# Altium PCB NB3000XN.PcbDoc (part 70 of 71)
Units mil, origin at the board's own origin, x right, y up, seen from the top; angles counter-clockwise.
Board outline 9527.56 x 6929.77 mil, 6 copper layers (Top Layer, GND+SHIELD, MidLayer1, MidLayer2, P2 - 3V3+5V0, Bottom Layer), stack 62.375 mil thick; 832 components, 1027 nets, 4655 pads, 4981 vias.
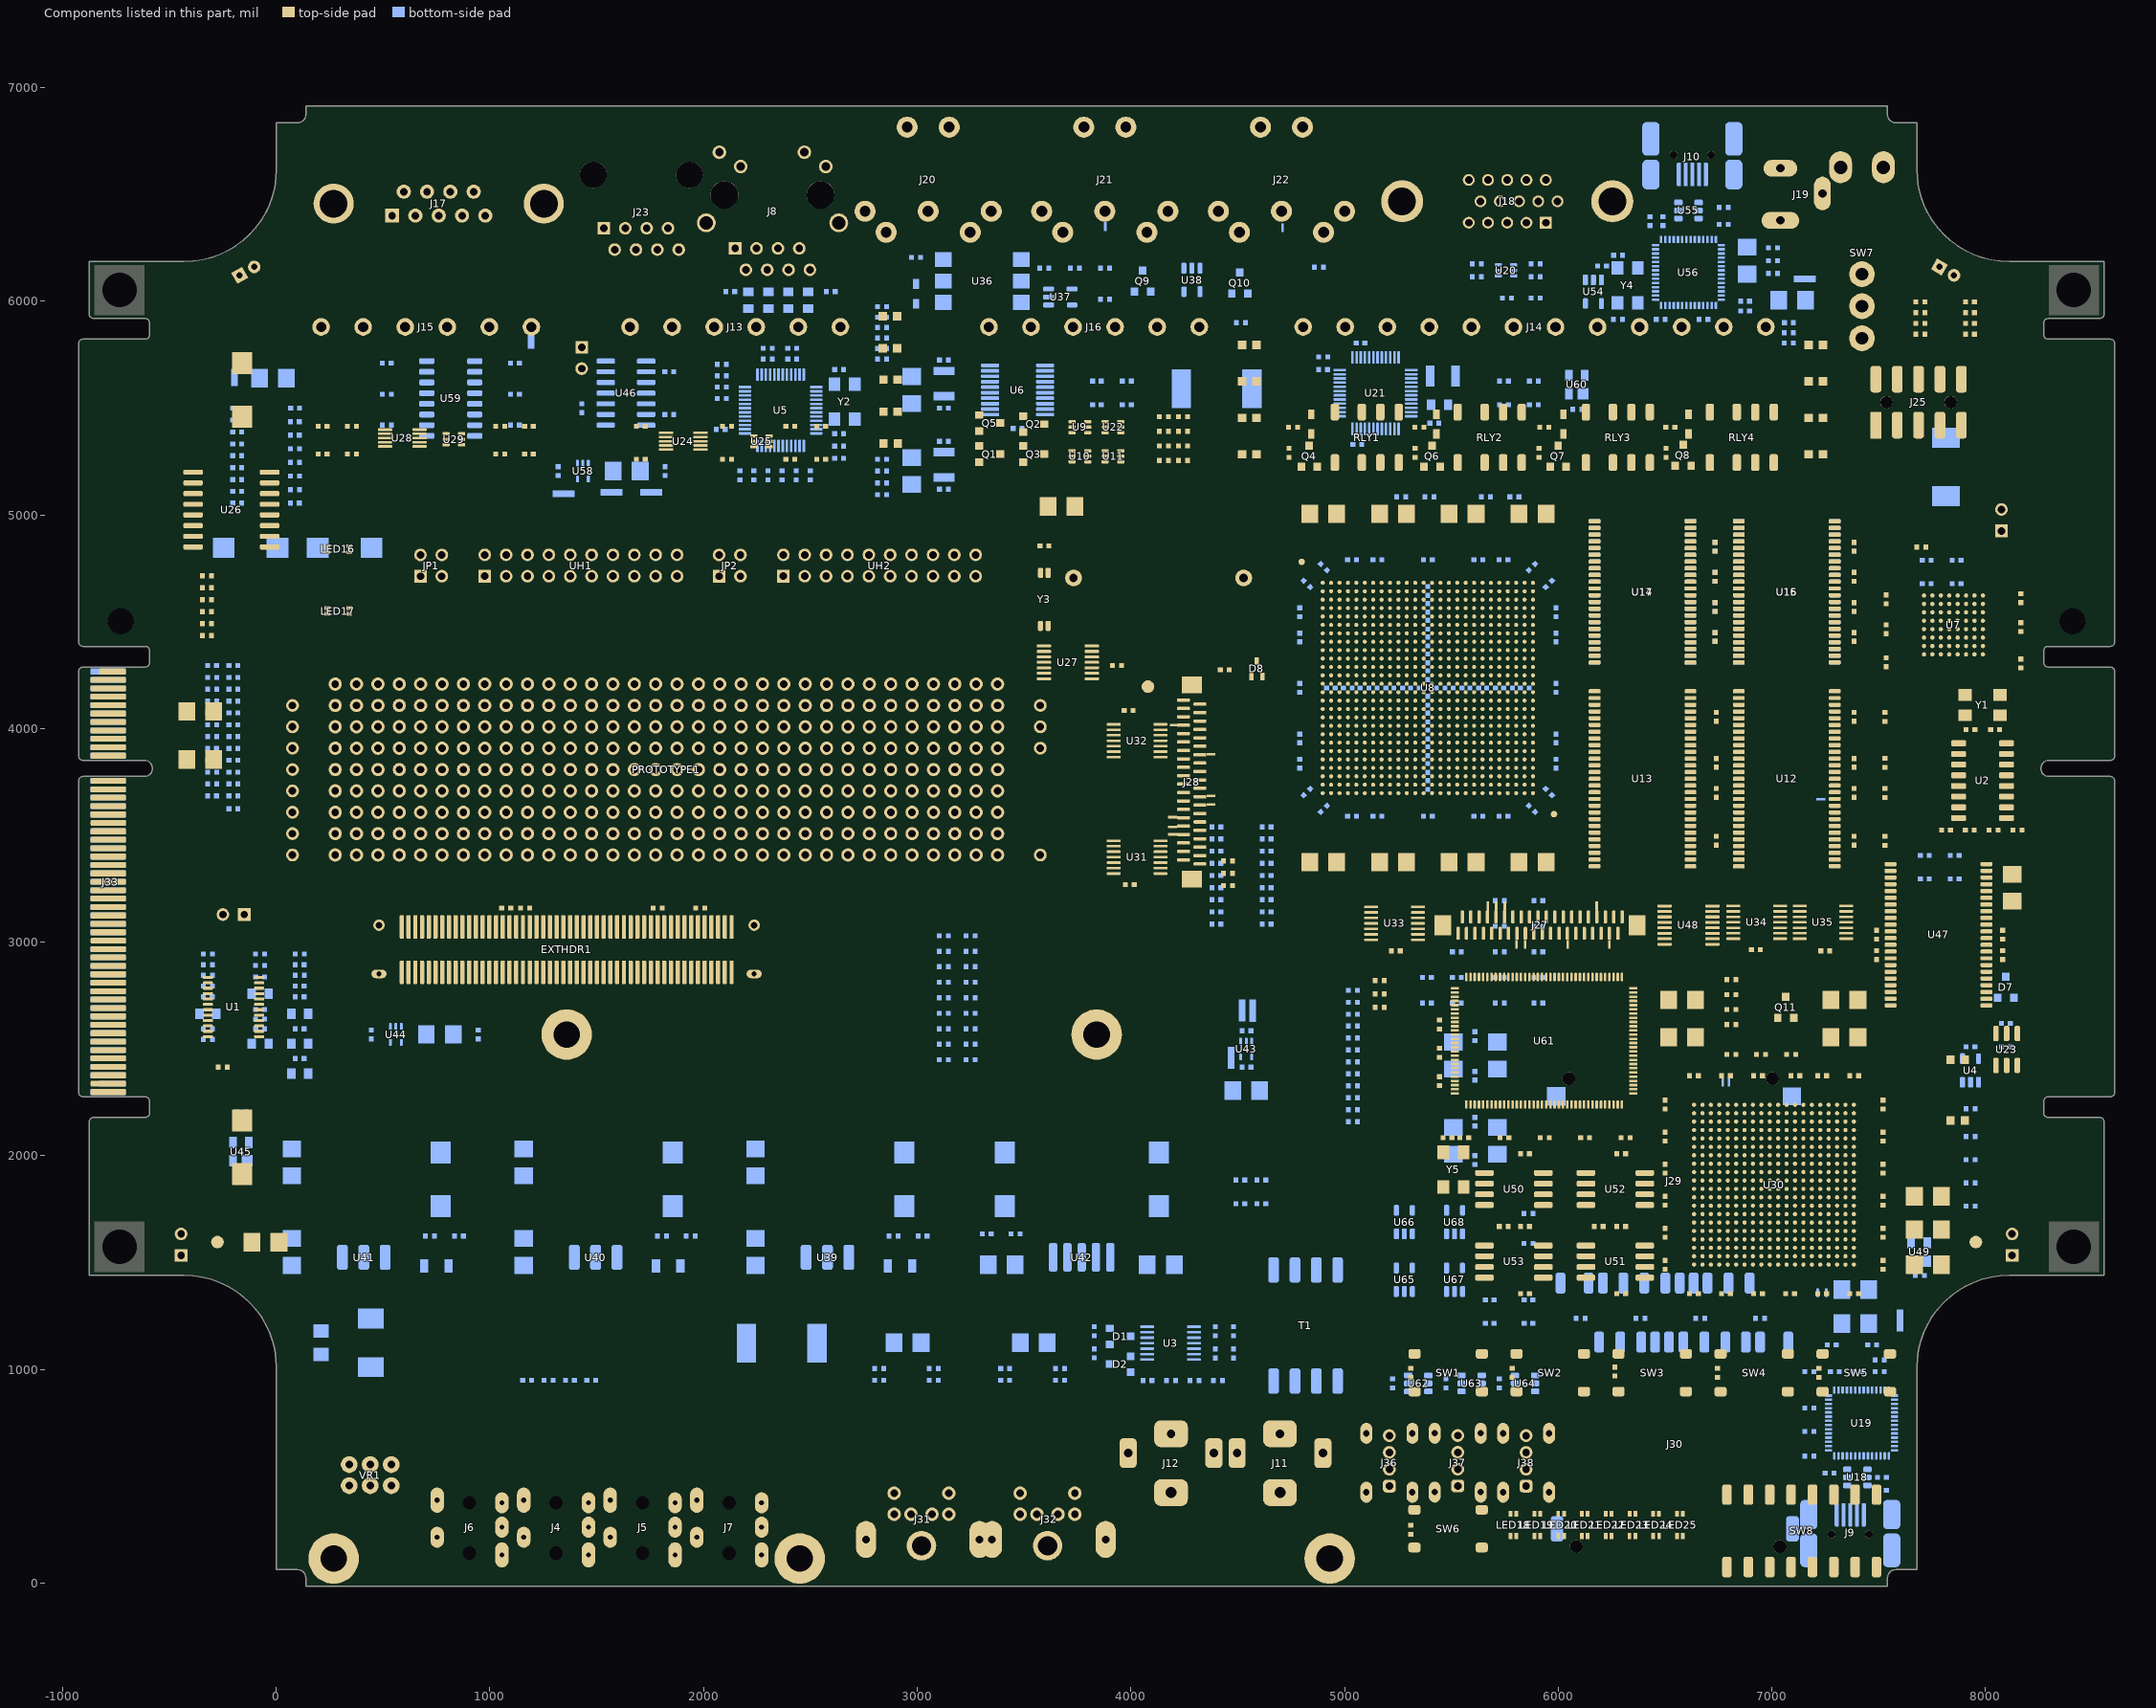
[diagram p74: the components of this part, seen from the top]

## Keep-outs
Keep-Out Layer:
  lines w15: -923.8,2295.89 -923.31,2291.51 -921.85,2287.35 -919.5,2283.62 -916.39,2280.5 -912.66,2278.15 -908.49,2276.7 -904.11,2276.2 -612.78,2276.2 -608.4,2275.71 -604.24,2274.25 -600.5,2271.91 -597.39,2268.79 -595.04,2265.06 -593.59,2260.9 -593.09,2256.52 -593.09,2199.42 -593.59,2195.04 -595.04,2190.88 -597.39,2187.15 -600.5,2184.03 -604.24,2181.68 -608.4,2180.23 -612.78,2179.74 -854.9,2179.74 -859.28,2179.24 -863.44,2177.79 -867.17,2175.44 -870.29,2172.32 -872.64,2168.59 -874.09,2164.43 -874.59,2160.05 -874.59,1441.32 -431.67,1441.32 -389.22,1439.23 -347.19,1433 -305.96,1422.67 -265.94,1408.35 -227.52,1390.18 -191.07,1368.33 -156.94,1343.01 -125.45,1314.46 -96.9,1282.97 -71.59,1248.83 -49.74,1212.37 -31.57,1173.95 -17.25,1133.93 -6.92,1092.7 -0.69,1050.65 1.4,1008.2 1.4,63.2 99.82,63.2 108.58,62.22 116.9,59.3 124.37,54.61 130.6,48.38 135.29,40.91 138.21,32.59 139.19,23.83 139.19,-15.55 7540.77,-15.55 7540.77,23.83 7541.76,32.59 7544.67,40.91 7549.36,48.38 7555.59,54.61 7563.06,59.31 7571.38,62.22 7580.14,63.2 7678.56,63.2 7678.56,1008.2 7680.65,1050.65 7686.89,1092.7 7697.21,1133.93 7711.53,1173.95 7729.7,1212.37 7751.55,1248.83 7776.87,1282.97 7805.41,1314.46 7836.9,1343.01 7871.03,1368.33 7907.49,1390.18 7945.91,1408.35 7985.92,1422.67 8027.15,1433 8069.19,1439.23 8111.63,1441.32 8554.55,1441.32 8554.55,2160.05 8554.05,2164.43 8552.6,2168.59 8550.25,2172.32 8547.13,2175.44 8543.4,2177.79 8539.24,2179.24 8534.86,2179.74 8292.74,2179.74 8288.36,2180.23 8284.2,2181.68 8280.47,2184.03 8277.35,2187.15 8275,2190.88 8273.55,2195.04 8273.05,2199.42 8273.05,2256.52 8273.55,2260.9 8275,2265.06 8277.35,2268.79 8280.47,2271.91 8284.2,2274.25 8288.36,2275.71 8292.74,2276.2 8584.08,2276.2 8588.46,2276.7 8592.62,2278.15 8596.35,2280.5 8599.46,2283.62 8601.81,2287.35 8603.27,2291.51 8603.76,2295.89 8603.76,3756.1 8603.27,3760.48 8601.81,3764.64 8599.46,3768.38 8596.35,3771.5 8592.62,3773.84 8588.46,3775.3 8584.08,3775.79 8296.67,3775.79 8288.9,3776.61 8281.46,3779.03 8274.69,3782.93 8268.88,3788.17 8264.28,3794.49 8261.1,3801.64 8259.48,3809.29 8259.48,3817.11 8261.1,3824.76 8264.28,3831.9 8268.88,3838.23 8274.69,3843.46 8281.46,3847.37 8288.9,3849.79 8296.67,3850.6 8584.08,3850.6 8588.46,3851.1 8592.62,3852.55 8596.35,3854.9 8599.46,3858.02 8601.81,3861.75 8603.27,3865.91 8603.76,3870.29 8603.76,4268.57 8603.27,4272.95 8601.81,4277.11 8599.46,4280.84 8596.35,4283.96 8592.62,4286.3 8588.46,4287.76 8584.08,4288.25 8292.74,4288.25 8288.36,4288.75 8284.2,4290.2 8280.47,4292.55 8277.35,4295.67 8275,4299.4 8273.55,4303.56 8273.05,4307.94 8273.05,4365.03 8273.55,4369.41 8275,4373.58 8277.35,4377.31 8280.47,4380.43 8284.2,4382.77 8288.36,4384.23 8292.74,4384.72 8584.08,4384.72 8588.46,4385.21 8592.62,4386.67 8596.35,4389.02 8599.46,4392.13 8601.81,4395.87 8603.27,4400.03 8603.76,4404.41 8603.76,5803 8603.27,5807.38 8601.81,5811.54 8599.46,5815.28 8596.35,5818.39 8592.62,5820.74 8588.46,5822.19 8584.08,5822.69 8292.74,5822.69 8288.36,5823.18 8284.2,5824.64 8280.47,5826.98 8277.35,5830.1 8275,5833.83 8273.55,5837.99 8273.05,5842.37 8273.05,5899.47 8273.55,5903.85 8275,5908.01 8277.35,5911.74 8280.47,5914.86 8284.2,5917.2 8288.36,5918.66 8292.74,5919.16 8534.86,5919.16 8539.24,5919.65 8543.4,5921.1 8547.13,5923.45 8550.25,5926.57 8552.6,5930.3 8554.05,5934.46 8554.55,5938.84 8554.55,6185.98 8110.73,6185.98 8068.37,6188.06 8026.42,6194.28 7985.28,6204.59 7945.35,6218.88 7907.01,6237.01 7870.63,6258.82 7836.57,6284.09 7805.14,6312.57 7776.66,6344 7751.4,6378.07 7729.59,6414.45 7711.46,6452.79 7697.17,6492.73 7686.87,6533.88 7680.65,6575.83 7678.56,6618.2 7678.56,6835.48 7580.14,6835.48 7571.38,6836.46 7563.05,6839.37 7555.59,6844.07 7549.36,6850.3 7544.67,6857.77 7541.76,6866.09 7540.77,6874.85 7540.77,6914.22 139.19,6914.22 139.19,6874.85 138.21,6866.09 135.29,6857.76 130.6,6850.3 124.37,6844.06 116.9,6839.37 108.58,6836.46 99.82,6835.47 1.4,6835.47 1.4,6618.2 -0.68,6575.83 -6.91,6533.87 -17.21,6492.73 -31.5,6452.79 -49.63,6414.45 -71.43,6378.07 -96.7,6344 -125.18,6312.57 -156.61,6284.09 -190.67,6258.82 -227.05,6237.01 -265.39,6218.88 -305.32,6204.59 -346.46,6194.28 -388.41,6188.06 -430.77,6185.98 -874.59,6185.98 -874.59,5938.84 -874.09,5934.46 -872.64,5930.3 -870.29,5926.57 -867.17,5923.45 -863.44,5921.1 -859.28,5919.65 -854.9,5919.15 -612.78,5919.15 -608.4,5918.66 -604.24,5917.2 -600.5,5914.86 -597.39,5911.74 -595.04,5908.01 -593.59,5903.85 -593.09,5899.47 -593.09,5842.37 -593.59,5837.99 -595.04,5833.83 -597.39,5830.1 -600.5,5826.98 -604.24,5824.64 -608.4,5823.18 -612.78,5822.69 -904.11,5822.69 -908.49,5822.19 -912.66,5820.74 -916.39,5818.39 -919.5,5815.27 -921.85,5811.54 -923.31,5807.38 -923.8,5803 -923.8,4404.41 -923.31,4400.03 -921.85,4395.87 -919.5,4392.13 -916.39,4389.02 -912.66,4386.67 -908.49,4385.21 -904.11,4384.72 -612.78,4384.72 -608.4,4384.23 -604.24,4382.77 -600.5,4380.43 -597.39,4377.31 -595.04,4373.58 -593.59,4369.41 -593.09,4365.03 -593.09,4307.94 -593.59,4303.56 -595.04,4299.4 -597.39,4295.67 -600.5,4292.55 -604.24,4290.2 -608.4,4288.75 -612.78,4288.25 -904.11,4288.25 -908.49,4287.76 -912.66,4286.3 -916.39,4283.96 -919.5,4280.84 -921.85,4277.11 -923.31,4272.95 -923.8,4268.56 -923.8,3870.29 -923.31,3865.91 -921.85,3861.75 -919.5,3858.01 -916.39,3854.9 -912.66,3852.55 -908.49,3851.1 -904.11,3850.6 -616.71,3850.6 -608.94,3849.79 -601.5,3847.37 -594.73,3843.46 -588.92,3838.23 -584.32,3831.9 -581.14,3824.76 -579.52,3817.11 -579.52,3809.29 -581.14,3801.64 -584.32,3794.49 -588.92,3788.17 -594.73,3782.93 -601.5,3779.02 -608.94,3776.61 -616.71,3775.79 -904.11,3775.79 -908.49,3775.3 -912.66,3773.84 -916.39,3771.49 -919.5,3768.38 -921.85,3764.64 -923.31,3760.48 -923.8,3756.1 -923.8,2295.89 ; -530.1,1864.15 -530.1,2218.52 -529.11,2227.28 -526.2,2235.6 -521.51,2243.07 -515.27,2249.3 -507.81,2253.99 -499.49,2256.91 -490.73,2257.89 -392.3,2257.89 -383.54,2256.91 -375.22,2253.99 -367.76,2249.3 -361.52,2243.07 -356.83,2235.6 -353.92,2227.28 -352.93,2218.52 -352.93,1864.15 -353.92,1855.38 -356.83,1847.06 -361.52,1839.6 -367.76,1833.36 -375.22,1828.67 -383.54,1825.76 -392.3,1824.77 -490.73,1824.77 -499.49,1825.76 -507.81,1828.67 -515.27,1833.36 -521.51,1839.6 -526.2,1847.06 -529.11,1855.38 -530.1,1864.15 ; -530.1,5407.88 -529.11,5399.11 -526.2,5390.79 -521.51,5383.32 -515.27,5377.09 -507.81,5372.4 -499.49,5369.49 -490.73,5368.5 -392.3,5368.5 -383.54,5369.49 -375.22,5372.4 -367.76,5377.09 -361.52,5383.32 -356.83,5390.79 -353.92,5399.11 -352.93,5407.88 -352.93,5762.25 -353.92,5771.01 -356.83,5779.33 -361.52,5786.8 -367.76,5793.03 -375.22,5797.72 -383.54,5800.64 -392.3,5801.62 -490.73,5801.62 -499.49,5800.64 -507.81,5797.72 -515.27,5793.03 -521.51,5786.8 -526.2,5779.33 -529.11,5771.01 -530.1,5762.25 -530.1,5407.88 ; 3623.45,3616.32 3624.43,3607.56 3627.34,3599.24 3632.03,3591.77 3638.27,3585.54 3645.73,3580.85 3654.05,3577.94 3662.81,3576.95 4017.15,3576.95 4025.91,3577.94 4034.23,3580.85 4041.69,3585.54 4047.93,3591.77 4052.62,3599.24 4055.53,3607.56 4056.52,3616.32 4056.52,3714.76 4055.53,3723.52 4052.62,3731.84 4047.93,3739.31 4041.69,3745.54 4034.23,3750.24 4025.91,3753.15 4017.15,3754.13 3662.81,3754.13 3654.05,3753.15 3645.73,3750.24 3638.27,3745.54 3632.03,3739.31 3627.34,3731.84 3624.43,3723.52 3623.45,3714.76 3623.45,3616.32 ; 4505.53,3715.21 4506.03,3710.83 4507.48,3706.67 4509.83,3702.94 4512.95,3699.82 4516.68,3697.47 4520.84,3696.02 4525.22,3695.52 4631.52,3695.52 4635.9,3696.02 4640.06,3697.47 4643.79,3699.82 4646.91,3702.94 4649.25,3706.67 4650.71,3710.83 4651.21,3715.21 4651.21,3912.08 4650.71,3916.47 4649.25,3920.63 4646.91,3924.36 4643.79,3927.48 4640.06,3929.82 4635.9,3931.28 4631.52,3931.77 4525.22,3931.77 4520.84,3931.28 4516.68,3929.82 4512.95,3927.48 4509.83,3924.36 4507.48,3920.63 4506.03,3916.47 4505.53,3912.08 4505.53,3715.21 ; 5224.07,2182.81 5224.57,2178.43 5226.02,2174.27 5228.37,2170.54 5231.48,2167.42 5235.21,2165.08 5239.37,2163.62 5243.76,2163.13 5350.06,2163.13 5354.43,2163.62 5358.6,2165.08 5362.33,2167.42 5365.45,2170.54 5367.79,2174.27 5369.25,2178.43 5369.74,2182.81 5369.74,2379.69 5369.25,2384.07 5367.79,2388.23 5365.45,2391.96 5362.33,2395.08 5358.6,2397.42 5354.43,2398.88 5350.06,2399.37 5243.76,2399.37 5239.37,2398.88 5235.21,2397.42 5231.48,2395.08 5228.37,2391.96 5226.02,2388.23 5224.57,2384.07 5224.07,2379.69 5224.07,2182.81 ; 7581.87,2182.81 7582.37,2178.43 7583.83,2174.27 7586.17,2170.54 7589.29,2167.42 7593.02,2165.08 7597.18,2163.62 7601.56,2163.13 7707.86,2163.13 7712.24,2163.62 7716.4,2165.08 7720.13,2167.42 7723.25,2170.54 7725.6,2174.27 7727.05,2178.43 7727.54,2182.81 7727.54,2379.69 7727.05,2384.07 7725.6,2388.23 7723.25,2391.96 7720.13,2395.08 7716.4,2397.42 7712.24,2398.88 7707.86,2399.37 7601.56,2399.37 7597.18,2398.88 7593.02,2397.42 7589.29,2395.08 7586.17,2391.96 7583.83,2388.23 7582.37,2384.07 7581.87,2379.69 7581.87,2182.81 ; 7603.95,3715.21 7604.45,3710.83 7605.9,3706.67 7608.25,3702.94 7611.37,3699.82 7615.1,3697.47 7619.26,3696.02 7623.64,3695.52 7729.94,3695.52 7734.32,3696.02 7738.48,3697.47 7742.21,3699.82 7745.33,3702.94 7747.67,3706.67 7749.13,3710.83 7749.62,3715.21 7749.62,3912.08 7749.13,3916.47 7747.67,3920.63 7745.33,3924.36 7742.21,3927.48 7738.48,3929.82 7734.32,3931.28 7729.94,3931.77 7623.64,3931.77 7619.26,3931.28 7615.1,3929.82 7611.37,3927.48 7608.25,3924.36 7605.9,3920.63 7604.45,3916.47 7603.95,3912.08 7603.95,3715.21 ; 8032.89,1864.15 8033.88,1855.39 8036.79,1847.06 8041.48,1839.6 8047.72,1833.36 8055.18,1828.67 8063.5,1825.76 8072.26,1824.77 8170.69,1824.77 8179.45,1825.76 8187.77,1828.67 8195.24,1833.36 8201.47,1839.6 8206.16,1847.06 8209.07,1855.39 8210.06,1864.15 8210.06,2218.52 8209.07,2227.28 8206.16,2235.6 8201.47,2243.07 8195.24,2249.3 8187.77,2254 8179.45,2256.91 8170.69,2257.89 8072.26,2257.89 8063.5,2256.91 8055.18,2254 8047.72,2249.3 8041.48,2243.07 8036.79,2235.6 8033.88,2227.28 8032.89,2218.52 8032.89,1864.15 ; 8032.89,5407.88 8033.88,5399.11 8036.79,5390.79 8041.48,5383.32 8047.72,5377.09 8055.18,5372.4 8063.5,5369.49 8072.26,5368.5 8170.69,5368.5 8179.45,5369.49 8187.77,5372.4 8195.24,5377.09 8201.47,5383.32 8206.16,5390.79 8209.07,5399.11 8210.06,5407.88 8210.06,5762.25 8209.07,5771.01 8206.16,5779.33 8201.47,5786.8 8195.24,5793.03 8187.77,5797.72 8179.45,5800.64 8170.69,5801.62 8072.26,5801.62 8063.5,5800.64 8055.18,5797.72 8047.72,5793.03 8041.48,5786.8 8036.79,5779.33 8033.88,5771.01 8032.89,5762.25 8032.89,5407.88

## Other copper
Top Layer:
  rectangle net GND: 3455,5210 3535,5285
  region net 2V5: 4114.02,1421.93 4114.02,1456.93 4039.02,1456.93 4039.02,1421.93
  region net 2V5: 4114.02,1525.79 4114.02,1560.79 4039.02,1560.79 4039.02,1525.79
  region net 2V5: 4167.01,1686.77 4167.01,1721.77 4092.01,1721.77 4092.01,1686.77
  region net 2V5: 4167.01,1808.82 4167.01,1843.82 4092.01,1843.82 4092.01,1808.82
  rectangle net GND: 3455,5350 3535,5439
  rectangle net GND: 3250,5355 3330,5430
  rectangle net GND: 3250,5210 3330,5285
  rectangle net GND: 115,4495 185,4525
  rectangle net 5V0: 5,1450 40,1525
  rectangle net 5V0: 108.86,1450 143.86,1525
  rectangle net GND: 108.86,1575.98 143.86,1650.98
  rectangle net 5V0: 258.86,1475 293.86,1585
  rectangle net 3V3: 428.86,1475 463.86,1670
  rectangle net 3V3: 454.85,1590 485,1670
  rectangle net GND: 5,1995 145,2070
  rectangle net 3V3: 5,1869.02 145,1944.02
  rectangle net 2V5: 1090,1868.03 1230,1943.03
  rectangle net GND: 1090,1994.02 1230,2069.02
  rectangle net 1V8: 2175,1868.03 2315,1943.03
  rectangle net GND: 2175,1994.02 2315,2069.02
  rectangle net 2V5: 1539.85,1590 1570,1670
  rectangle net 2V5: 1513.86,1475 1548.86,1670
  rectangle net 5V0: 1343.86,1475 1378.86,1585
  rectangle net 1V8: 2624.85,1590 2655,1670
  rectangle net 1V8: 2598.86,1475 2633.86,1670
  rectangle net 3V3: 2428.86,1475 2463.86,1585
  rectangle net GND: 2175,1574.02 2315,1649.02
  rectangle net 3V3: 2175,1448.03 2315,1523.03
  rectangle net 5V0: 648.86,1447.5 683.86,1522.5
  rectangle net 5V0: 704.68,1447.5 739.68,1522.5
  rectangle net GND: 763.03,1447.5 798.03,1522.5
  rectangle net GND: 818.86,1447.5 853.86,1522.5
  rectangle net GND: 1090,1575.98 1125,1650.98
  rectangle net 5V0: 1090,1450 1125,1525
  rectangle net GND: 1193.86,1575.98 1228.86,1650.98
  rectangle net 5V0: 1193.86,1450 1228.86,1525
  region net GND: 807.01,2060.79 807.01,2095.79 732.01,2095.79 732.01,2060.79
  region net GND: 807.01,1938.74 807.01,1973.74 732.01,1973.74 732.01,1938.74
  region net 3V3: 807.01,1808.82 807.01,1843.82 732.01,1843.82 732.01,1808.82
  region net 3V3: 807.01,1686.77 807.01,1721.77 732.01,1721.77 732.01,1686.77
  region net GND: 1892.01,2060.79 1892.01,2095.79 1817.01,2095.79 1817.01,2060.79
  region net GND: 1892.01,1938.74 1892.01,1973.74 1817.01,1973.74 1817.01,1938.74
  region net 2V5: 1862.01,1808.82 1862.01,1843.82 1787.01,1843.82 1787.01,1808.82
  region net 2V5: 1862.01,1686.77 1862.01,1721.77 1787.01,1721.77 1787.01,1686.77
  rectangle net 5V0: 1733.86,1447.5 1768.86,1522.5
  rectangle net 5V0: 1789.68,1447.5 1824.68,1522.5
  rectangle net GND: 1848.03,1447.5 1883.03,1522.5
  rectangle net GND: 1903.86,1447.5 1938.86,1522.5
  region net GND: 2977.01,2060.79 2977.01,2095.79 2902.01,2095.79 2902.01,2060.79
  region net GND: 3017.44,2052.64 2982.44,2052.64 2982.44,1977.64 3017.44,1977.64
  region net 1V8: 2895.39,1800.67 2860.39,1800.67 2860.39,1725.67 2895.39,1725.67
  region net 1V8: 2962.01,1686.77 2962.01,1721.77 2887.01,1721.77 2887.01,1686.77
  rectangle net 3V3: 2818.86,1447.5 2853.86,1522.5
  rectangle net 3V3: 2874.68,1447.5 2909.68,1522.5
  rectangle net GND: 2933.03,1447.5 2968.03,1522.5
  rectangle net GND: 2988.86,1447.5 3023.86,1522.5
  region net GND: 3446.46,2060.79 3446.46,2095.79 3371.46,2095.79 3371.46,2060.79
  region net GND: 3446.46,1938.74 3446.46,1973.74 3371.46,1973.74 3371.46,1938.74
  region net 1V2: 3364.84,1810.67 3329.84,1810.67 3329.84,1735.67 3364.84,1735.67
  region net 1V2: 3486.89,1810.67 3451.89,1810.67 3451.89,1735.67 3486.89,1735.67
  region net GND: 3369.02,1525.79 3369.02,1560.79 3294.02,1560.79 3294.02,1525.79
  region net 1V2: 3495,1525.79 3495,1560.79 3420,1560.79 3420,1525.79
  region net GND: 3369.02,1421.93 3369.02,1456.93 3294.02,1456.93 3294.02,1421.93
  region net 1V2: 3495,1421.93 3495,1456.93 3420,1456.93 3420,1421.93
  region net 1V2: 3680,1421.86 3680,1456.86 3540,1456.86 3540,1421.86
  rectangle net GND: 3753.86,1391.01 3788.86,1466.01
  region net GND: 4240,1421.93 4240,1456.93 4165,1456.93 4165,1421.93
  region net GND: 4240,1523.86 4240,1558.86 4165,1558.86 4165,1523.86
  region net GND: 4167.01,1938.74 4167.01,1973.74 4092.01,1973.74 4092.01,1938.74
  region net GND: 4167.01,2060.79 4167.01,2095.79 4092.01,2095.79 4092.01,2060.79
  region net 3V3: 386,1670 331,1670 331,1590 386,1590
  region net 3V3: 387.14,1670 363,1670 363,1475 387.14,1475
  region net 5V0: 357,1585 331,1585 331,1475 357,1475
  region net 5V0: 1442,1585 1416,1585 1416,1475 1442,1475
  region net 2V5: 1472.14,1670 1448,1670 1448,1475 1472.14,1475
  region net 2V5: 1471,1670 1416,1670 1416,1590 1471,1590
  region net 3V3: 2527,1585 2501,1585 2501,1475 2527,1475
  region net 1V8: 2557.14,1670 2533,1670 2533,1475 2557.14,1475
  region net 1V8: 2556,1670 2500.99,1670 2500.99,1590 2556,1590
  region net GND: 110.08,1648.78 110.08,1683.78 35.08,1683.78 35.08,1648.78
  region net 5V0: 757,3132 757,3155 670,3155 670,3132
  region net 3V3: 820,3131.84 820,3154.84 764.65,3154.84 764.65,3131.84
  region net 2V5: 882.84,3132 882.84,3155 827.48,3155 827.48,3132
  region net 1V8: 945.83,3132 945.83,3155 890.47,3155 890.47,3132
  region net PWMPWR: 3346,5718.96 3346,5741.96 3232.65,5741.96 3232.65,5718.96
  region net 5V0: 4707,5718 4707,5741.96 4622.65,5741.96 4622.65,5718
  rectangle net 5V0: -687.6,2292.5 -648.1,2345.8
  rectangle net +B: 7750,5265 7880,5315
  rectangle net GND: 7749.51,5134.9 7879.51,5184.9
  region net 1V2: 1008.98,3131.84 1008.98,3154.84 953.62,3154.84 953.62,3131.84
  rectangle net AUGND: 1095,560 1125,630
  pour cut-out: 4878.19,4701.81 5901.81,4701.81 5901.81,3678.19 4878.19,3678.19
  pour cut-out: 6615.37,2260.05 7403.7,2258.7 7403.7,1471.3 6616.3,1471.3
  pour cut-out: 7691.59,4643.83 8007.48,4642.48 8007.48,4327.52 7692.52,4327.52
MidLayer1:
  rectangle net SHIELD: 5590,364.61 5790,774.61
  rectangle net SHIELD: 3540,-15.55 3680,245
  rectangle net SHIELD: 2950,-15.55 3090,245
  rectangle net SHIELD: 3830,-15.55 3935,300
  rectangle net SHIELD: 3235,-15.55 3410,300
  rectangle net SHIELD: 5270,365 5470,775
MidLayer2:
  rectangle net SHIELD: 7470,6625 7575,6914.22
  rectangle net SHIELD: 7270,6625 7375,6914.22
  rectangle net SHIELD: 6160,6460 6350,6920
  rectangle net SHIELD: 5175,6460 5365,6920
Bottom Layer:
  drawing of 98 lines, arcs and shapes, not listed
P2 - 3V3+5V0 (plane layer: these items are gaps in the copper):
  lines w10: 0.1,500.1 2432.5,500.1 cw(c2432.5,467.5) 2465.1,467.5 ; 849.4,1356.3 986.3,1356.3 ccw(c986.3,1435.04) 1065.04,1435.04 1065.04,1510 cw(c1143.78,1510) 1143.78,1588.74 1210,1588.74 ccw(c1210,1648.74) 1252.43,1606.31 1293.55,1647.44 cw(c1335.98,1605.01) 1335.98,1665.01 1365,1665 cw(c1365,1586.26) 1443.74,1586.26 1443.74,1435.04 ccw(c1522.48,1435.04) 1522.48,1356.3 1618.7,1356.3 ccw(c1618.7,1435.04) 1697.44,1435.04 1697.44,1482.44 cw(c1776.18,1482.44) 1776.18,1561.18 cw(c1776.18,1482.44) 1854.92,1482.44 1854.92,1435.04 ccw(c1933.66,1435.04) 1933.66,1356.3 3703.7,1356.3 cw(c3703.7,1277.56) 3782.44,1277.56 3782.44,482.56 ccw(c3861.18,482.56) 3861.18,403.82 4950,403.82 ccw(c4950,482.56) 5028.74,482.56 5028.74,908.74 cw(c5107.48,908.74) 5107.48,987.48 5197.52,987.48 cw(c5197.52,908.74) 5276.26,908.74 ccw(c5331.94,908.74) 5331.94,853.06 5366.94,853.06 ccw(c5366.94,908.74) 5422.63,908.74 cw(c5478.31,908.74) 5478.31,964.43 cw(c5478.31,908.74) 5534,908.74 ccw(c5589.68,908.74) 5589.68,853.06 5616.94,853.06 ccw(c5616.94,908.74) 5672.63,908.74 cw(c5728.31,908.74) 5728.31,964.43 cw(c5728.31,908.74) 5784,908.74 ccw(c5839.68,908.74) 5839.68,853.06 6551.94,853.06 cw(c6551.94,774.32) 6630.68,774.32 6630.68,-14.86 ; 849.96,1356.3 cw(c849.96,1435.04) 771.22,1435.04 771.22,1490 ccw(c692.48,1490) 692.48,1568.74 ccw(c692.48,1490) 613.74,1490 613.74,1435.04 cw(c535,1435.04) 535,1356.3 438.7,1356.3 cw(c438.7,1435.04) 359.96,1435.04 359.96,1625.04 ccw(c281.22,1625.04) 281.22,1703.78 56.22,1703.78 cw(c56.22,1782.52) -22.52,1782.52 -22.52,2317.52 ccw(c-101.26,2317.52) -101.26,2396.26 -430,2396.26 cw(c-430,2475) -508.74,2475 -508.74,2863.78 cw(c-430,2863.78) -430,2942.52 302.52,2942.52 cw(c302.52,2863.78) 381.26,2863.78 381.26,2580 ccw(c460,2580) 460,2501.26 522.52,2501.26 ccw(c522.52,2580) 601.26,2580 601.26,2863.78 cw(c680,2863.78) 680,2942.52 ccw(c680,3021.26) 758.74,3021.26 758.74,3166.26 ccw(c680,3166.26) 680,3245 -430,3245 cw(c-430,3323.74) -508.74,3323.74 -508.74,3877.52 cw(c-430,3877.52) -430,3956.26 85.95,3956.26 ccw(c85.95,4035) 164.69,4035 164.69,4269.69 cw(c243.43,4269.69) 243.43,4348.43 651.61,4348.43 ccw(c651.61,4427.17) 730.35,4427.17 730.35,4832.17 cw(c809.09,4832.17) 809.09,4910.91 819.09,4910.91 cw(c819.09,4832.17) 897.83,4832.17 897.83,4427.17 ccw(c976.57,4427.17) 976.57,4348.43 3041.57,4348.43 cw(c3041.57,4269.69) 3120.31,4269.69 3120.31,3350.58 ccw(c3180.31,3350.58) 3137.89,3308.15 3505.46,2940.58 ccw(c3547.89,2983) 3547.89,2923 ; 1911.22,5183.63 1911.22,5621.22 cw(c1989.96,5621.22) 1989.96,5699.96 2695.08,5699.96 ccw(c2695.08,5778.7) 2773.82,5778.7 2773.82,5848.7 cw(c2852.56,5848.7) 2852.56,5927.44 cw(c2852.56,5848.7) 2931.3,5848.7 ccw(c3010.04,5848.7) 3010.04,5769.96 3565.04,5769.96 ccw(c3565.04,5848.7) 3643.78,5848.7 3643.78,5974.96 3643.78,6166.26 cw(c3722.52,6166.26) 3722.52,6245 cw(c3722.52,6166.26) 3801.26,6166.26 3801.26,5848.7 ccw(c3880,5848.7) 3880,5769.96 4152.56,5769.96 ccw(c4152.56,5848.7) 4231.3,5848.7 4231.3,6040 cw(c4310.04,6040) 4310.04,6118.74 4356.3,6118.74 cw(c4356.3,6040) 4435.04,6040 4435.04,5490 ccw(c4513.78,5490) 4513.78,5411.26 4560.04,5411.26 ccw(c4560.04,5490) 4638.78,5490 4638.78,5620 cw(c4717.52,5620) 4717.52,5698.74 cw(c4717.52,5620) 4796.26,5620 4796.26,5490 ccw(c4875,5490) 4875,5411.26 4921.26,5411.26 ccw(c4921.26,5490) 5000,5490 5000,5620 cw(c5078.74,5620) 5078.74,5698.74 5268.78,5698.74 cw(c5268.78,5620) 5347.52,5620 5347.52,5465 ccw(c5426.26,5465) 5426.26,5386.26 5541.22,5386.26 ccw(c5541.22,5465) 5619.96,5465 5619.96,5624.96 cw(c5698.7,5624.96) 5698.7,5703.7 6133.78,5703.7 cw(c6133.78,5624.96) 6212.52,5624.96 cw(c6133.78,5624.96) 6133.78,5546.22 6035,5546.22 ccw(c6035,5467.48) 5956.26,5467.48 ccw(c6035,5467.48) 6035,5388.74 6728.74,5388.74 ccw(c6728.74,5467.48) 6807.48,5467.48 6807.48,5752.52 ccw(c6728.74,5752.52) 6728.74,5831.26 6128.74,5831.26 cw(c6128.74,5910) 6050,5910 6050,6345 cw(c6152.5,6347.5) 6150,6450 6863.63,6450 cw(c6863.63,6394.32) 6919.32,6394.32 ; 1911.65,5183.21 ccw(c1971.65,5183.21) 1929.22,5140.78 2105.71,4964.29 cw(c2063.28,4921.87) 2123.28,4921.87 2123.28,4626.72 ccw(c2202.02,4626.72) 2202.02,4547.98 4307.02,4547.98 cw(c4307.02,4469.24) 4385.76,4469.24 4385.76,3279.24 ccw(c4464.5,3279.24) 4464.5,3200.5 5369.5,3195.88 ; 2465,-15 2465,465 ; 3547.91,2923.02 4223.78,2923.02 cw(c4223.78,2844.28) 4302.52,2844.28 4302.52,2690 ccw(c4381.26,2690) 4381.26,2611.26 4532.52,2611.26 ccw(c4532.52,2690) 4611.26,2690 4611.26,2844.28 cw(c4690,2844.28) 4690,2923.02 5028.7,2923.02 cw(c5028.7,2844.28) 5107.44,2844.28 5107.44,2077.56 ccw(c5186.18,2077.56) 5186.18,1998.82 5359.5,1998.82 ccw(c5359.5,2077.56) 5438.24,2077.56 cw(c5516.98,2077.56) 5516.98,2156.3 5656.22,2156.3 ccw(c5656.22,2235.04) 5734.96,2235.04 ccw(c5656.22,2235.04) 5656.22,2313.78 5516.98,2313.78 cw(c5516.98,2392.52) 5438.24,2392.52 5438.24,2402.52 ccw(c5359.5,2402.52) 5359.5,2481.26 cw(c5359.5,2560) 5280.76,2560 5280.76,2844.28 cw(c5359.5,2844.28) 5359.5,2923.02 ccw(c5359.5,3001.76) 5438.24,3001.76 5438.24,3121.76 ccw(c5359.5,3121.76) 5359.5,3200.5 ; 5015.76,4150.63 ccw(c4996.3,4150.63) 4976.84,4150.63 4920.63,4150.63 4920.63,4229.37 4976.84,4229.37 ccw(c4996.3,4229.37) 5015.76,4229.37 ; 5016.21,4150.63 cw(c5035.67,4150.63) 5055.13,4150.63 ; 5016.21,4229.37 ccw(c5035.67,4229.37) 5055.13,4229.37 ; 5055.58,4150.63 cw(c5075.04,4150.63) 5094.5,4150.63 ; 5055.58,4229.37 ccw(c5075.04,4229.37) 5094.5,4229.37 ; 5094.95,4150.63 cw(c5114.41,4150.63) 5133.87,4150.63 ; 5094.95,4229.37 ccw(c5114.41,4229.37) 5133.87,4229.37 ; 5134.32,4150.63 cw(c5153.78,4150.63) 5173.24,4150.63 ; 5134.32,4229.37 cw(c5153.78,4229.37) 5173.24,4229.37 ; 5173.69,4150.63 cw(c5193.15,4150.63) 5212.61,4150.63 ; 5173.69,4229.37 ccw(c5193.15,4229.37) 5212.61,4229.37 ; 5213.06,4150.63 cw(c5232.52,4150.63) 5251.98,4150.63 ; 5213.06,4229.37 ccw(c5232.52,4229.37) 5251.98,4229.37 5252.43,4229.82 5252.43,4308.11 cw(c5271.89,4308.11) 5271.89,4327.57 5350.18,4327.57 ; 5252.43,4150.18 5252.43,4071.89 ccw(c5271.89,4071.89) 5271.89,4052.43 5350.18,4052.43 ; 5350.63,3815.76 cw(c5350.63,3796.3) 5350.63,3776.84 5350.63,3720.63 5429.37,3720.63 5429.37,3776.84 cw(c5429.37,3796.3) 5429.37,3815.76 ; 5350.63,3816.21 ccw(c5350.63,3835.67) 5350.63,3855.13 ; 5350.63,3855.58 ccw(c5350.63,3875.04) 5350.63,3894.5 ; 5350.63,3894.95 ccw(c5350.63,3914.41) 5350.63,3933.87 ; 5350.63,3934.32 ccw(c5350.63,3953.78) 5350.63,3973.24 ; 5350.63,3973.69 ccw(c5350.63,3993.15) 5350.63,4012.61 ; 5350.63,4013.06 cw(c5350.63,4032.52) 5350.63,4051.98 ; 5350.63,4328.02 ccw(c5350.63,4347.48) 5350.63,4366.94 ; 5350.63,4367.39 ccw(c5350.63,4386.85) 5350.63,4406.31 ; 5350.63,4406.76 ccw(c5350.63,4426.22) 5350.63,4445.68 ; 5350.63,4446.13 ccw(c5350.63,4465.59) 5350.63,4485.05 ; 5350.63,4485.5 ccw(c5350.63,4504.96) 5350.63,4524.42 ; 5350.63,4524.87 ccw(c5350.63,4544.33) 5350.63,4563.79 ; 5350.63,4564.24 ccw(c5350.63,4583.7) 5350.63,4603.16 5350.63,4659.37 5429.37,4659.37 5429.37,4603.16 ccw(c5429.37,4583.7) 5429.37,4564.24 ; 5429.37,3816.21 cw(c5429.37,3835.67) 5429.37,3855.13 ; 5429.37,3855.58 cw(c5429.37,3875.04) 5429.37,3894.5 ; 5429.37,3894.95 cw(c5429.37,3914.41) 5429.37,3933.87 ; 5429.37,3934.32 ccw(c5429.37,3953.78) 5429.37,3973.24 ; 5429.37,3973.69 cw(c5429.37,3993.15) 5429.37,4012.61 ; 5429.37,4013.06 cw(c5429.37,4032.52) 5429.37,4051.98 ; 5429.37,4328.02 cw(c5429.37,4347.48) 5429.37,4366.94 ; 5429.37,4367.39 cw(c5429.37,4386.85) 5429.37,4406.31 ; 5429.37,4406.76 ccw(c5429.37,4426.22) 5429.37,4445.68 ; 5429.37,4446.13 cw(c5429.37,4465.59) 5429.37,4485.05 ; 5429.37,4485.5 cw(c5429.37,4504.96) 5429.37,4524.42 ; 5429.37,4524.87 cw(c5429.37,4544.33) 5429.37,4563.79 ; 5429.82,4052.43 5508.11,4052.43 ccw(c5508.11,4071.89) 5527.57,4071.89 5527.57,4150.18 ; 5429.82,4327.57 5508.11,4327.57 cw(c5508.11,4308.11) 5527.57,4308.11 5527.57,4229.82 ; 5528.02,4150.63 cw(c5547.48,4150.63) 5566.94,4150.63 ; 5528.02,4229.37 ccw(c5547.48,4229.37) 5566.94,4229.37 ; 5567.39,4150.63 cw(c5586.85,4150.63) 5606.31,4150.63 ; 5567.39,4229.37 ccw(c5586.85,4229.37) 5606.31,4229.37 ; 5606.76,4150.63 ccw(c5626.22,4150.63) 5645.68,4150.63 ; 5606.76,4229.37 ccw(c5626.22,4229.37) 5645.68,4229.37 ; 5646.13,4150.63 cw(c5665.59,4150.63) 5685.05,4150.63 ; 5646.13,4229.37 ccw(c5665.59,4229.37) 5685.05,4229.37 ; 5685.5,4150.63 cw(c5704.96,4150.63) 5724.42,4150.63 ; 5685.5,4229.37 ccw(c5704.96,4229.37) 5724.42,4229.37 ; 5724.87,4150.63 cw(c5744.33,4150.63) 5763.79,4150.63 ; 5724.87,4229.37 ccw(c5744.33,4229.37) 5763.79,4229.37 ; 5764.24,4150.63 cw(c5783.7,4150.63) 5803.16,4150.63 5859.37,4150.63 5859.37,4229.37 5803.16,4229.37 cw(c5783.7,4229.37) 5764.24,4229.37 ; 6814.15,1924.28 cw(c6814.15,1943.74) 6814.15,1963.2 ; 6814.61,1962.74 6852.52,1962.74 ; 6814.65,1923.76 cw(c6814.65,1905.04) 6833.38,1905.04 ; 6833.52,1905 6833.52,1786.26 ccw(c6852.52,1786.26) 6852.52,1767.26 ; 6853.19,1767.12 cw(c6853.19,1748.39) 6871.91,1748.39 ; 6853.19,1962.88 ccw(c6853.19,1981.61) 6871.91,1981.61 ; 6872.43,1747.89 ccw(c6891.89,1747.89) 6911.35,1747.89 ; 6872.43,1982.11 cw(c6891.89,1982.11) 6911.35,1982.11 ; 6911.87,1748.39 cw(c6930.59,1748.39) 6930.59,1767.12 7089.41,1767.12 cw(c7089.41,1748.39) 7108.13,1748.39 ; 6911.87,1981.61 ccw(c6930.59,1981.61) 6930.59,1962.88 7089.41,1962.88 ccw(c7089.41,1981.61) 7108.13,1981.61 ; 7108.65,1747.89 ccw(c7128.11,1747.89) 7147.57,1747.89 ; 7108.65,1982.11 cw(c7128.11,1982.11) 7147.57,1982.11 ; 7148.09,1748.39 cw(c7166.81,1748.39) 7166.81,1767.12 ; 7148.09,1981.61 ccw(c7166.81,1981.61) 7166.81,1962.88 ; 7167.48,1767.26 ccw(c7167.48,1786.26) 7186.48,1786.26 7186.48,1943.74 ccw(c7167.48,1943.74) 7167.48,1962.74 ; 8603.29,3084.53 8200.47,3084.53 7457.48,3084.53 ccw(c7457.48,3028.84) 7401.8,3028.84 7401.8,2931.8 cw(c7346.11,2931.8) 7346.11,2876.11 6930,2876.11 cw(c6930,2931.8) 6874.32,2931.8 6874.32,2999.32 cw(c6930,2999.32) 6930,3055 ccw(c6930,3110.68) 6985.68,3110.68 6985.68,3183.2 cw(c7041.37,3183.2) 7041.37,3238.89 7346.11,3238.89 cw(c7346.11,3183.2) 7401.8,3183.2 ccw(c7457.48,3183.2) 7457.48,3127.52 8100,3127.52 ccw(c8100,3206.26) 8178.74,3206.26 8178.74,4245.04 8178.74,5140.04 ccw(c8100,5140.04) 8100,5218.78 7981.22,5218.78 cw(c7981.22,5297.52) 7902.48,5297.52 ; 6919.32,6394.32 cw(c6975,6394.32) 6975,6450 7045,6450 cw(c7042.5,6192.5) 7300,6190 7300,5980 ccw(c7378.74,5980) 7378.74,5901.26 7823.74,5901.26 cw(c7823.74,5822.52) 7902.48,5822.52 7902.48,5297.52 ; 6919.32,6394.32 6919.32,6362.94 ccw(c6975,6362.94) 6975,6307.26 7010,6307.26 cw(c7010,6251.57) 7065.68,6251.57 7065.68,6204.32 ccw(c7121.37,6204.32) 7121.37,6148.63 7161.37,6148.63 cw(c7161.37,6092.95) 7217.05,6092.95 7217.05,5790 ccw(c7295.79,5790) 7295.79,5711.26 7471.94,5711.26 7663.74,5711.26 cw(c7663.74,5647.68) 7727.32,5647.68 7727.32,5297.52 ccw(c7806.06,5297.52) 7806.06,5218.78 7823.74,5218.78 ccw(c7823.74,5297.52) 7902.48,5297.52
  text "5V0" at 7345,6299 h30
  text "+B" at 7160,6245 h30
  text "3V3" at 6955,6150 h30
  text "AUGND" at 75,430 h30
GND+SHIELD (plane layer: these items are gaps in the copper):
  lines w10: -530.1,1895 -530.1,1565 ccw(c-470.1,1565) -470.1,1505 515,1505 cw(c515,1445) 575,1445 575,1210 cw(c515,1210) 515,1150 210,1150 ccw(c210,1090) 150,1090 150,375 ccw(c210,375) 210,315 2775,315 ; -526.2,2235.6 -526.2,5396.2 ; -525.94,3175.26 79.74,3175.26 ccw(c79.74,3205.26) 109.74,3205.26 109.75,4033.54 ccw(c76.12,4033.54) 76.12,4067.16 cw(c76.12,4108.23) 76.12,4149.31 ccw(c76.12,4182.93) 109.75,4182.93 109.74,5475 109.74,5739.74 ccw(c79.74,5739.74) 79.74,5769.74 -325.77,5769.74 ; -430,2270 -430,2975 cw(c-400,2975) -400,3005 195,3005 cw(c195,2975) 225,2975 225,2260 cw(c195,2260) 195,2230 -340,2230 ; -352.91,5741.94 181.84,6276.69 cw(c224.27,6234.27) 224.27,6294.27 365.43,6294.27 ccw(c365.43,6354.27) 425.43,6354.27 425.43,6565.73 cw(c485.43,6565.73) 485.43,6625.73 1035.73,6625.73 cw(c1035.73,6565.73) 1095.73,6565.73 1095.73,6354.27 ccw(c1155.73,6354.27) 1155.73,6294.27 1391.56,6294.27 ccw(c1391.56,6354.27) 1433.99,6311.84 1534.57,6412.43 cw(c1577,6370) 1577,6430 1791,6430 cw(c1791,6370) 1833.43,6412.43 1934.01,6311.84 ccw(c1976.44,6354.27) 1976.44,6294.27 ; 822.49,2662.37 822.49,3217.66 ccw(c762.49,3217.66) 804.91,3260.09 752.66,3312.34 cw(c795.09,3354.77) 735.09,3354.77 735.05,3408.23 cw(c776.12,3408.23) 817.19,3408.23 817.23,3354.77 ccw(c877.23,3354.77) 834.81,3312.34 ; 822.85,2662.01 ccw(c882.85,2662.01) 840.42,2619.58 1247.57,2212.43 cw(c1205.15,2170) 1265.15,2170 ; 834.94,3312.34 869.85,3277.43 cw(c827.43,3235) 887.43,3235 ; 887.43,2887.57 1632.57,2887.57 cw(c1632.57,2827.57) 1675,2870 2332.57,2212.43 cw(c2290.15,2170) 2350.15,2170 ; 887.43,3167.57 1000,3167.57 ; 887.43,3234.99 887.43,2702.42 ccw(c947.43,2702.42) 905.01,2660 ; 905.15,2660 1332.57,2232.57 ccw(c1375,2275) 1375,2215 1695.69,2215 cw(c1695.69,2155) 1755.69,2155 1755.69,1915 ccw(c1815.69,1915) 1815.69,1855 cw(c1815.69,1795) 1875.69,1795 1875.69,1674.02 cw(c1815.69,1674.02) 1815.69,1614.02 1605,1614.02 ccw(c1605,1554.02) 1545,1554.02 1545,1480 ; 950,3165 950,3035 ccw(c1010,3035) 1010,2975 1730,2975 cw(c1730,2915) 1772.43,2957.43 2978.26,1751.59 ccw(c3020.69,1794.02) 3020.69,1734.02 ; 952.57,3167.57 982.57,3167.57 1737.09,3167.57 cw(c1737.09,3107.57) 1779.52,3150 3027.57,1901.94 ccw(c3070,1944.37) 3070,1884.37 3359.37,1884.37 4834.69,1884.37 ccw(c4834.69,1963.11) 4913.43,1963.11 4913.43,2046.57 4913.43,2752.52 cw(c4992.17,2752.52) 4992.17,2831.26 5081.26,2831.26 ccw(c5081.26,2910) 5160,2910 5160,3490 cw(c5238.74,3490) 5238.74,3568.74 ccw(c5238.74,3647.48) 5317.48,3647.48 5317.48,3920 ccw(c5238.74,3920) 5294.42,3975.68 cw(c5350.1,4031.36) 5271.36,4031.36 5271.89,4053.98 cw(c5271.89,4071.89) 5271.89,4089.8 ; 1214,5562.61 1214,5789.88 ccw(c1184,5789.88) 1184,5819.88 cw(c1184,5849.88) 1154,5849.88 1154,5905.73 cw(c1184,5905.73) 1184,5935.73 1264.78,5935.73 cw(c1264.78,5905.73) 1294.78,5905.73 1294.78,5502.61 1294.78,5227.39 cw(c1264.78,5227.39) 1264.78,5197.39 139.74,5197.39 cw(c139.74,5227.39) 109.74,5227.39 109.74,5502.61 cw(c139.74,5502.61) 139.74,5532.61 1184,5532.61 ccw(c1184,5562.61) 1214,5562.61 ; 1265,2169.85 1265,2005 cw(c1215,2005) 1215,1955 1095,1955 ccw(c1095,1905) 1045,1905 ccw(c1095,1905) 1095,1855 1385,1855 cw(c1385,1795) 1445,1795 1445,1480 ; 1445,1515 1445,1300 ccw(c1495,1300) 1495,1250 4075,1250 ; 1545,1515 1545,1390 ccw(c1595,1390) 1595,1340 3975,1340 ; 1978.67,6294.27 2053.67,6294.27 2602.33,6294.27 2677.33,6294.27 ; 2350,2169.85 2350,2005 cw(c2300,2005) 2300,1955 2180,1955 ccw(c2180,1905) 2130,1905 ccw(c2180,1905) 2180,1855 2470,1855 cw(c2470,1795) 2530,1795 2530,1480 ccw(c2580,1480) 2580,1430 ccw(c2580,1480) 2630,1480 2630,1554.02 cw(c2690,1554.02) 2690,1614.02 2900.69,1614.02 ccw(c2900.69,1674.02) 2960.69,1674.02 cw(c3020.69,1674.02) 3020.69,1734.02 ; 2630.08,5532.61 ccw(c2630.08,5562.61) 2660.08,5562.61 2660.08,5789.88 ccw(c2630.08,5789.88) 2630.08,5819.88 cw(c2630.08,5849.88) 2600.08,5849.88 2600.08,5905.73 cw(c2630.08,5905.73) 2630.08,5935.73 2710.87,5935.73 cw(c2710.87,5905.73) 2740.87,5905.73 2740.87,5502.61 2740.87,5227.39 cw(c2710.87,5227.39) 2710.87,5197.39 1585.83,5197.39 cw(c1585.83,5227.39) 1555.83,5227.39 1555.83,5502.61 cw(c1585.83,5502.61) 1585.83,5532.61 2635,5532.61 ; 2679.56,6294.27 ccw(c2679.56,6354.27) 2721.99,6311.84 2976.84,6566.69 cw(c3019.27,6524.27) 3019.27,6584.27 4952.17,6584.27 cw(c4952.17,6524.27) 4994.6,6566.69 5188.72,6372.57 ccw(c5231.14,6415) 5231.14,6355 5306.14,6355 ; 2775.11,315.04 cw(c2775.11,255.04) 2817.54,297.46 2837.45,277.55 ccw(c2879.87,319.98) 2879.87,259.98 3172.33,259.98 ccw(c3172.33,319.98) 3214.76,277.55 3234.67,297.46 cw(c3277.09,255.04) 3277.09,315.04 3365.11,315.04 cw(c3365.11,255.04) 3407.54,297.46 3427.45,277.55 ccw(c3469.87,319.98) 3469.87,259.98 3762.33,259.98 ccw(c3762.33,319.98) 3804.76,277.55 3824.67,297.46 cw(c3867.09,255.04) 3867.09,315.04 3896.61,315.04 cw(c3896.61,255.04) 3939.03,297.46 3958.94,277.55 ccw(c4001.37,319.98) 4001.37,259.98 4990,259.98 ccw(c4990,319.98) 5050,319.98 5050,750 cw(c5080,750) 5080,780 5104.44,780 cw(c5104.44,750) 5134.44,750 5134.44,405 ccw(c5164.44,405) 5164.44,375 5235.35,375 5895.35,375 ccw(c5895.35,405) 5925.35,405 5925.35,750 cw(c5955.35,750) 5955.35,780 5979.79,780 cw(c5979.79,750) 6009.79,750 6009.79,319.98 cw(c5979.79,319.98) 5979.79,289.98 5359.98,289.98 ccw(c5359.98,259.98) 5329.98,259.98 5329.98,164.98 ccw(c5359.98,164.98) 5359.98,134.98 6590.02,134.98 cw(c6590.02,74.98) 6632.45,117.41 6652.35,97.5 ccw(c6694.78,139.93) 6694.78,79.93 7089.93,79.93 ccw(c7089.93,109.93) 7119.93,109.93 7119.93,354.93 cw(c7149.93,354.93) 7149.93,384.93 7225,384.93 cw(c7225,354.93) 7255,354.93 7255,295 ccw(c7285,295) 7285,265 7429.01,265 ccw(c7429.01,295) 7459.01,295 7459.01,354.93 cw(c7489.01,354.93) 7489.01,384.93 7564.09,384.93 cw(c7564.09,354.93) 7594.09,354.93 7594.09,64.12 ; 3975,1339.96 ccw(c3975,1389.96) 4025,1389.96 4025,1524.96 cw(c4075,1524.96) 4075,1574.96 cw(c4075,1524.96) 4125,1524.96 4125,1299.96 cw(c4075,1299.96) 4075,1249.96 ; 5160,4920 5160,5000 cw(c5238.74,5000) 5238.74,5078.74 5541.26,5078.74 cw(c5541.26,5000) 5620,5000 5620,4925 cw(c5541.26,4925) 5541.26,4846.26 ccw(c5541.26,4767.52) 5462.52,4767.52 5462.52,4460 ccw(c5541.26,4460) 5485.58,4404.32 cw(c5429.9,4348.64) 5508.64,4348.64 5507.58,4326.19 cw(c5507.58,4308.27) 5525.49,4308.2 ; 5160,4925 ccw(c5238.74,4925) 5238.74,4846.26 cw(c5238.74,4767.52) 5317.48,4767.52 5317.48,4460 cw(c5238.74,4460) 5294.42,4404.32 ccw(c5350.1,4348.64) 5271.36,4348.64 5271.89,4329.51 ; 5233.37,6355 5308.37,6355 ccw(c5308.37,6415) 5350.8,6372.57 5605.65,6627.43 ; 5271.36,4247.12 cw(c5271.36,4229.21) 5271.36,4211.29 5272.42,4168.71 ccw(c5272.42,4150.79) 5272.42,4132.88 ; 5271.36,4290.03 ccw(c5271.36,4307.95) 5271.36,4325.86 ; 5271.89,4089.86 ccw(c5271.89,4111.26) 5271.89,4132.66 ; 5271.89,4247.34 cw(c5271.89,4268.74) 5271.89,4290.14 ; 5508.11,4032.52 5508.64,4054.14 cw(c5508.64,4072.05) 5508.64,4089.97 ; 5508.11,4089.86 ccw(c5508.11,4111.26) 5508.11,4132.66 ; 5508.64,4031.36 cw(c5429.9,4031.36) 5485.58,3975.68 ccw(c5541.26,3920) 5462.52,3920 5462.52,3647.48 ccw(c5541.26,3647.48) 5541.26,3568.74 cw(c5541.26,3490) 5620,3490 5620,3260 cw(c5541.26,3260) 5541.26,3181.26 ccw(c5541.26,3102.52) 5462.52,3102.52 5462.52,2742.48 cw(c5383.78,2742.48) 5383.78,2663.74 5294.68,2663.74 ccw(c5294.68,2585) 5215.94,2585 5215.94,2460.94 5215.94,1963.43 ccw(c5294.68,1963.43) 5294.68,1884.68 6793.46,1884.68 ccw(c6793.46,1963.43) 6872.2,1963.43 6872.2,2561.57 ccw(c6793.46,2561.57) 6793.46,2640.32 6650,2640.32 cw(c6650,2719.06) 6571.26,2719.06 cw(c6650,2719.06) 6650,2797.8 7370,2797.8 cw(c7370,2719.06) 7448.74,2719.06 cw(c7370,2719.06) 7370,2640.32 7187.17,2640.32 ccw(c7187.17,2561.57) 7108.43,2561.57 7108.43,1963.43 ccw(c7187.17,1963.43) 7187.17,1884.68 7475,1884.68 7680.32,1884.68 cw(c7680.32,1825.63) 7680.32,1766.57 7475,1766.57 7187.17,1766.57 ccw(c7187.17,1687.83) 7108.43,1687.83 7108.42,1400 cw(c7029.68,1400) 7029.68,1321.26 6950.95,1321.26 cw(c6950.95,1400) 6872.21,1400 6872.2,1687.83 ccw(c6793.46,1687.83) 6793.46,1766.57 3825.94,1766.57 ccw(c3825.94,1687.83) 3747.2,1687.83 3747.2,1497.8 cw(c3668.46,1497.8) 3668.46,1419.06 3470,1419.06 cw(c3470,1497.8) 3391.26,1497.8 cw(c3470,1497.8) 3470,1576.54 ccw(c3470,1655.28) 3548.74,1655.28 ccw(c3470,1655.28) 3470,1734.02 3020.69,1734.02 ; 5508.64,4132.88 cw(c5508.64,4150.79) 5508.64,4168.71 5507.58,4211.29 ccw(c5507.58,4229.21) 5525.49,4229.28 ; 5525.1,4229.46 cw(c5543.01,4229.53) 5543.01,4247.45 ; 5525.1,4308.02 ccw(c5543.01,4307.95) 5543.01,4290.03 ; 5542.66,4247.34 5547.48,4247.34 ccw(c5547.48,4268.74) 5547.48,4290.14 5542.66,4290.14 ; 5605.94,6627.43 cw(c5648.37,6585) 5648.37,6645 5875,6645 cw(c5875,6585) 5917.43,6627.43 ; 5917.72,6627.43 6172.57,6372.57 ccw(c6215,6415) 6215,6355 6290,6355 ccw(c6290,6415) 6332.43,6372.57 6449.85,6490 cw(c6492.28,6447.57) 6492.28,6507.57 6495.99,6507.57 ccw(c6495.99,6537.57) 6525.99,6537.57 6525.99,6619 cw(c6555.99,6619) 6555.99,6649 6700,6649 cw(c6700,6619) 6730,6619 6730,6559.07 ccw(c6760,6559.07) 6760,6529.07 6860,6529.07 ccw(c6860,6589.07) 6920,6589.07 6920,6615 cw(c6980,6615) 6980,6675 7145,6675 cw(c7145,6615) 7187.43,6657.43 7336.57,6508.41 ccw(c7379,6550.84) 7379,6490.84 7697.85,6490.84
  text "AUGND" at -310,5725 h30
  text "AGND" at 155,5470 h30
  text "AGND" at 1601.08,5470 h30
  text "AUGND" at -410,2965 h30
  text "GND" at 1795,2365 h30
  text "2V5" at 1515,1950 h30
  text "1V8" at 2620,1900 h30
  text "1V2" at 3600,1775 h30
  text "SHIELD" at 75,1335 h30
Multi-Layer:
  pour cut-out: -701.84,4350 -1000,4350 -1000,2240 -701.84,2240
  lines w15 net SHIELD: -923.8,4404.41 -923.8,5803 -923.31,5807.38 -921.85,5811.54 -919.5,5815.27 -916.39,5818.39 -912.66,5820.74 -908.49,5822.19 -904.11,5822.69 -612.78,5822.69 -608.4,5823.18 -604.24,5824.64 -600.5,5826.98 -597.39,5830.1 -595.04,5833.83 -593.59,5837.99 -593.09,5842.37 -593.09,5899.47 -593.59,5903.85 -595.04,5908.01 -597.39,5911.74 -600.5,5914.86 -604.24,5917.2 -608.4,5918.66 -612.78,5919.15 -854.9,5919.15 -859.28,5919.65 -863.44,5921.1 -867.17,5923.45 -870.29,5926.57 -872.64,5930.3 -874.09,5934.46 -874.59,5938.84 -874.59,6185.98 -430.77,6185.98 -388.41,6188.06 -346.46,6194.28 -305.32,6204.59 -265.39,6218.88 -227.05,6237.01 -190.67,6258.82 -156.61,6284.09 -125.18,6312.57 -96.7,6344 -71.43,6378.07 -49.63,6414.45 -31.5,6452.79 -17.21,6492.73 -6.91,6533.87 -0.68,6575.83 1.4,6618.2 1.4,6835.47 99.82,6835.47 108.58,6836.46 116.9,6839.37 124.37,6844.06 130.6,6850.3 135.29,6857.76 138.21,6866.09 139.19,6874.85 139.19,6914.22 7540.77,6914.22 7540.77,6874.85 7541.76,6866.09 7544.67,6857.77 7549.36,6850.3 7555.59,6844.07 7563.05,6839.37 7571.38,6836.46 7580.14,6835.48 7678.56,6835.48 7678.56,6618.2 7680.65,6575.83 7686.87,6533.88 7697.17,6492.73 7711.46,6452.79 7729.59,6414.45 7751.4,6378.07 7776.66,6344 7805.14,6312.57 7836.57,6284.09 7870.63,6258.82 7907.01,6237.01 7945.35,6218.88 7985.28,6204.59 8026.42,6194.28 8068.37,6188.06 8110.73,6185.98 8554.55,6185.98 8554.55,5938.84 8554.05,5934.46 8552.6,5930.3 8550.25,5926.57 8547.13,5923.45 8543.4,5921.1 8539.24,5919.65 8534.86,5919.16 8292.74,5919.16 8288.36,5918.66 8284.2,5917.2 8280.47,5914.86 8277.35,5911.74 8275,5908.01 8273.55,5903.85 8273.05,5899.47 8273.05,5842.37 8273.55,5837.99 8275,5833.83 8277.35,5830.1 8280.47,5826.98 8284.2,5824.64 8288.36,5823.18 8292.74,5822.69 8584.08,5822.69 8588.46,5822.19 8592.62,5820.74 8596.35,5818.39 8599.46,5815.28 8601.81,5811.54 8603.27,5807.38 8603.76,5803 8603.76,4404.41 8603.27,4400.03 8601.81,4395.87 8599.46,4392.13 8596.35,4389.02 8592.62,4386.67 8588.46,4385.21 8584.08,4384.72 8292.74,4384.72 8288.36,4384.23 8284.2,4382.77 8280.47,4380.43 8277.35,4377.31 8275,4373.58 8273.55,4369.41 8273.05,4365.03 8273.05,4307.94 8273.55,4303.56 8275,4299.4 8277.35,4295.67 8280.47,4292.55 8284.2,4290.2 8288.36,4288.75 8292.74,4288.25 8584.08,4288.25 8588.46,4287.76 8592.62,4286.3 8596.35,4283.96 8599.46,4280.84 8601.81,4277.11 8603.27,4272.95 8603.76,4268.57 8603.76,3870.29 8603.27,3865.91 8601.81,3861.75 8599.46,3858.02 8596.35,3854.9 8592.62,3852.55 8588.46,3851.1 8584.08,3850.6 8296.67,3850.6 8288.9,3849.79 8281.46,3847.37 8274.69,3843.46 8268.88,3838.23 8264.28,3831.9 8261.1,3824.76 8259.48,3817.11 8259.48,3809.29 8261.1,3801.64 8264.28,3794.49 8268.88,3788.17 8274.69,3782.93 8281.46,3779.03 8288.9,3776.61 8296.67,3775.79 8584.08,3775.79 8588.46,3775.3 8592.62,3773.84 8596.35,3771.5 8599.46,3768.38 8601.81,3764.64 8603.27,3760.48 8603.76,3756.1 8603.76,2295.89 8603.27,2291.51 8601.81,2287.35 8599.46,2283.62 8596.35,2280.5 8592.62,2278.15 8588.46,2276.7 8584.08,2276.2 8292.74,2276.2 8288.36,2275.71 8284.2,2274.25 8280.47,2271.91 8277.35,2268.79 8275,2265.06 8273.55,2260.9 8273.05,2256.52 8273.05,2199.42 8273.55,2195.04 8275,2190.88 8277.35,2187.15 8280.47,2184.03 8284.2,2181.68 8288.36,2180.23 8292.74,2179.74 8534.86,2179.74 8539.24,2179.24 8543.4,2177.79 8547.13,2175.44 8550.25,2172.32 8552.6,2168.59 8554.05,2164.43 8554.55,2160.05 8554.55,1441.32 8111.63,1441.32 8069.19,1439.23 8027.15,1433 7985.92,1422.67 7945.91,1408.35 7907.49,1390.18 7871.03,1368.33 7836.9,1343.01 7805.41,1314.46 7776.87,1282.97 7751.55,1248.83 7729.7,1212.37 7711.53,1173.95 7697.21,1133.93 7686.89,1092.7 7680.65,1050.65 7678.56,1008.2 7678.56,63.2 7580.14,63.2 7571.38,62.22 7563.06,59.31 7555.59,54.61 7549.36,48.38 7544.67,40.91 7541.76,32.59 7540.77,23.83 7540.77,-15.55 139.19,-15.55 139.19,23.83 138.21,32.59 135.29,40.91 130.6,48.38 124.37,54.61 116.9,59.3 108.58,62.22 99.82,63.2 1.4,63.2 1.4,1008.2 -0.69,1050.65 -6.92,1092.7 -17.25,1133.93 -31.57,1173.95 -49.74,1212.37 -71.59,1248.83 -96.9,1282.97 -125.45,1314.46 -156.94,1343.01 -191.07,1368.33 -227.52,1390.18 -265.94,1408.35 -305.96,1422.67 -347.19,1433 -389.22,1439.23 -431.67,1441.32 -874.59,1441.32 -874.59,2160.05 -874.09,2164.43